# Altium PCB BetaBake_REV_1.0.PcbDoc (part 2 of 8)
Units mil, origin at the board's own origin, x right, y up, seen from the top; angles counter-clockwise.
Board outline 6000 x 4000 mil, 8 copper layers (USB 2.0 (90 Diff) DDR3 Data (50-100), GND (Top Layer high-speed return paths), DDR3 Fly-by Routing (Address, Command, Control), QSPI Flash (Clk, IO), Int4 PWR, Int5 GND (Shielding between L4 and L6), Int6 eMMC High-Speed Data Lines (8-bit bus), SDIO/peripherals, Int7 GND, Escapes, non-critical tracks, decoupling capacitor vias), stack 60.424 mil thick; 426 components, 331 nets, 1941 pads, 428 vias.
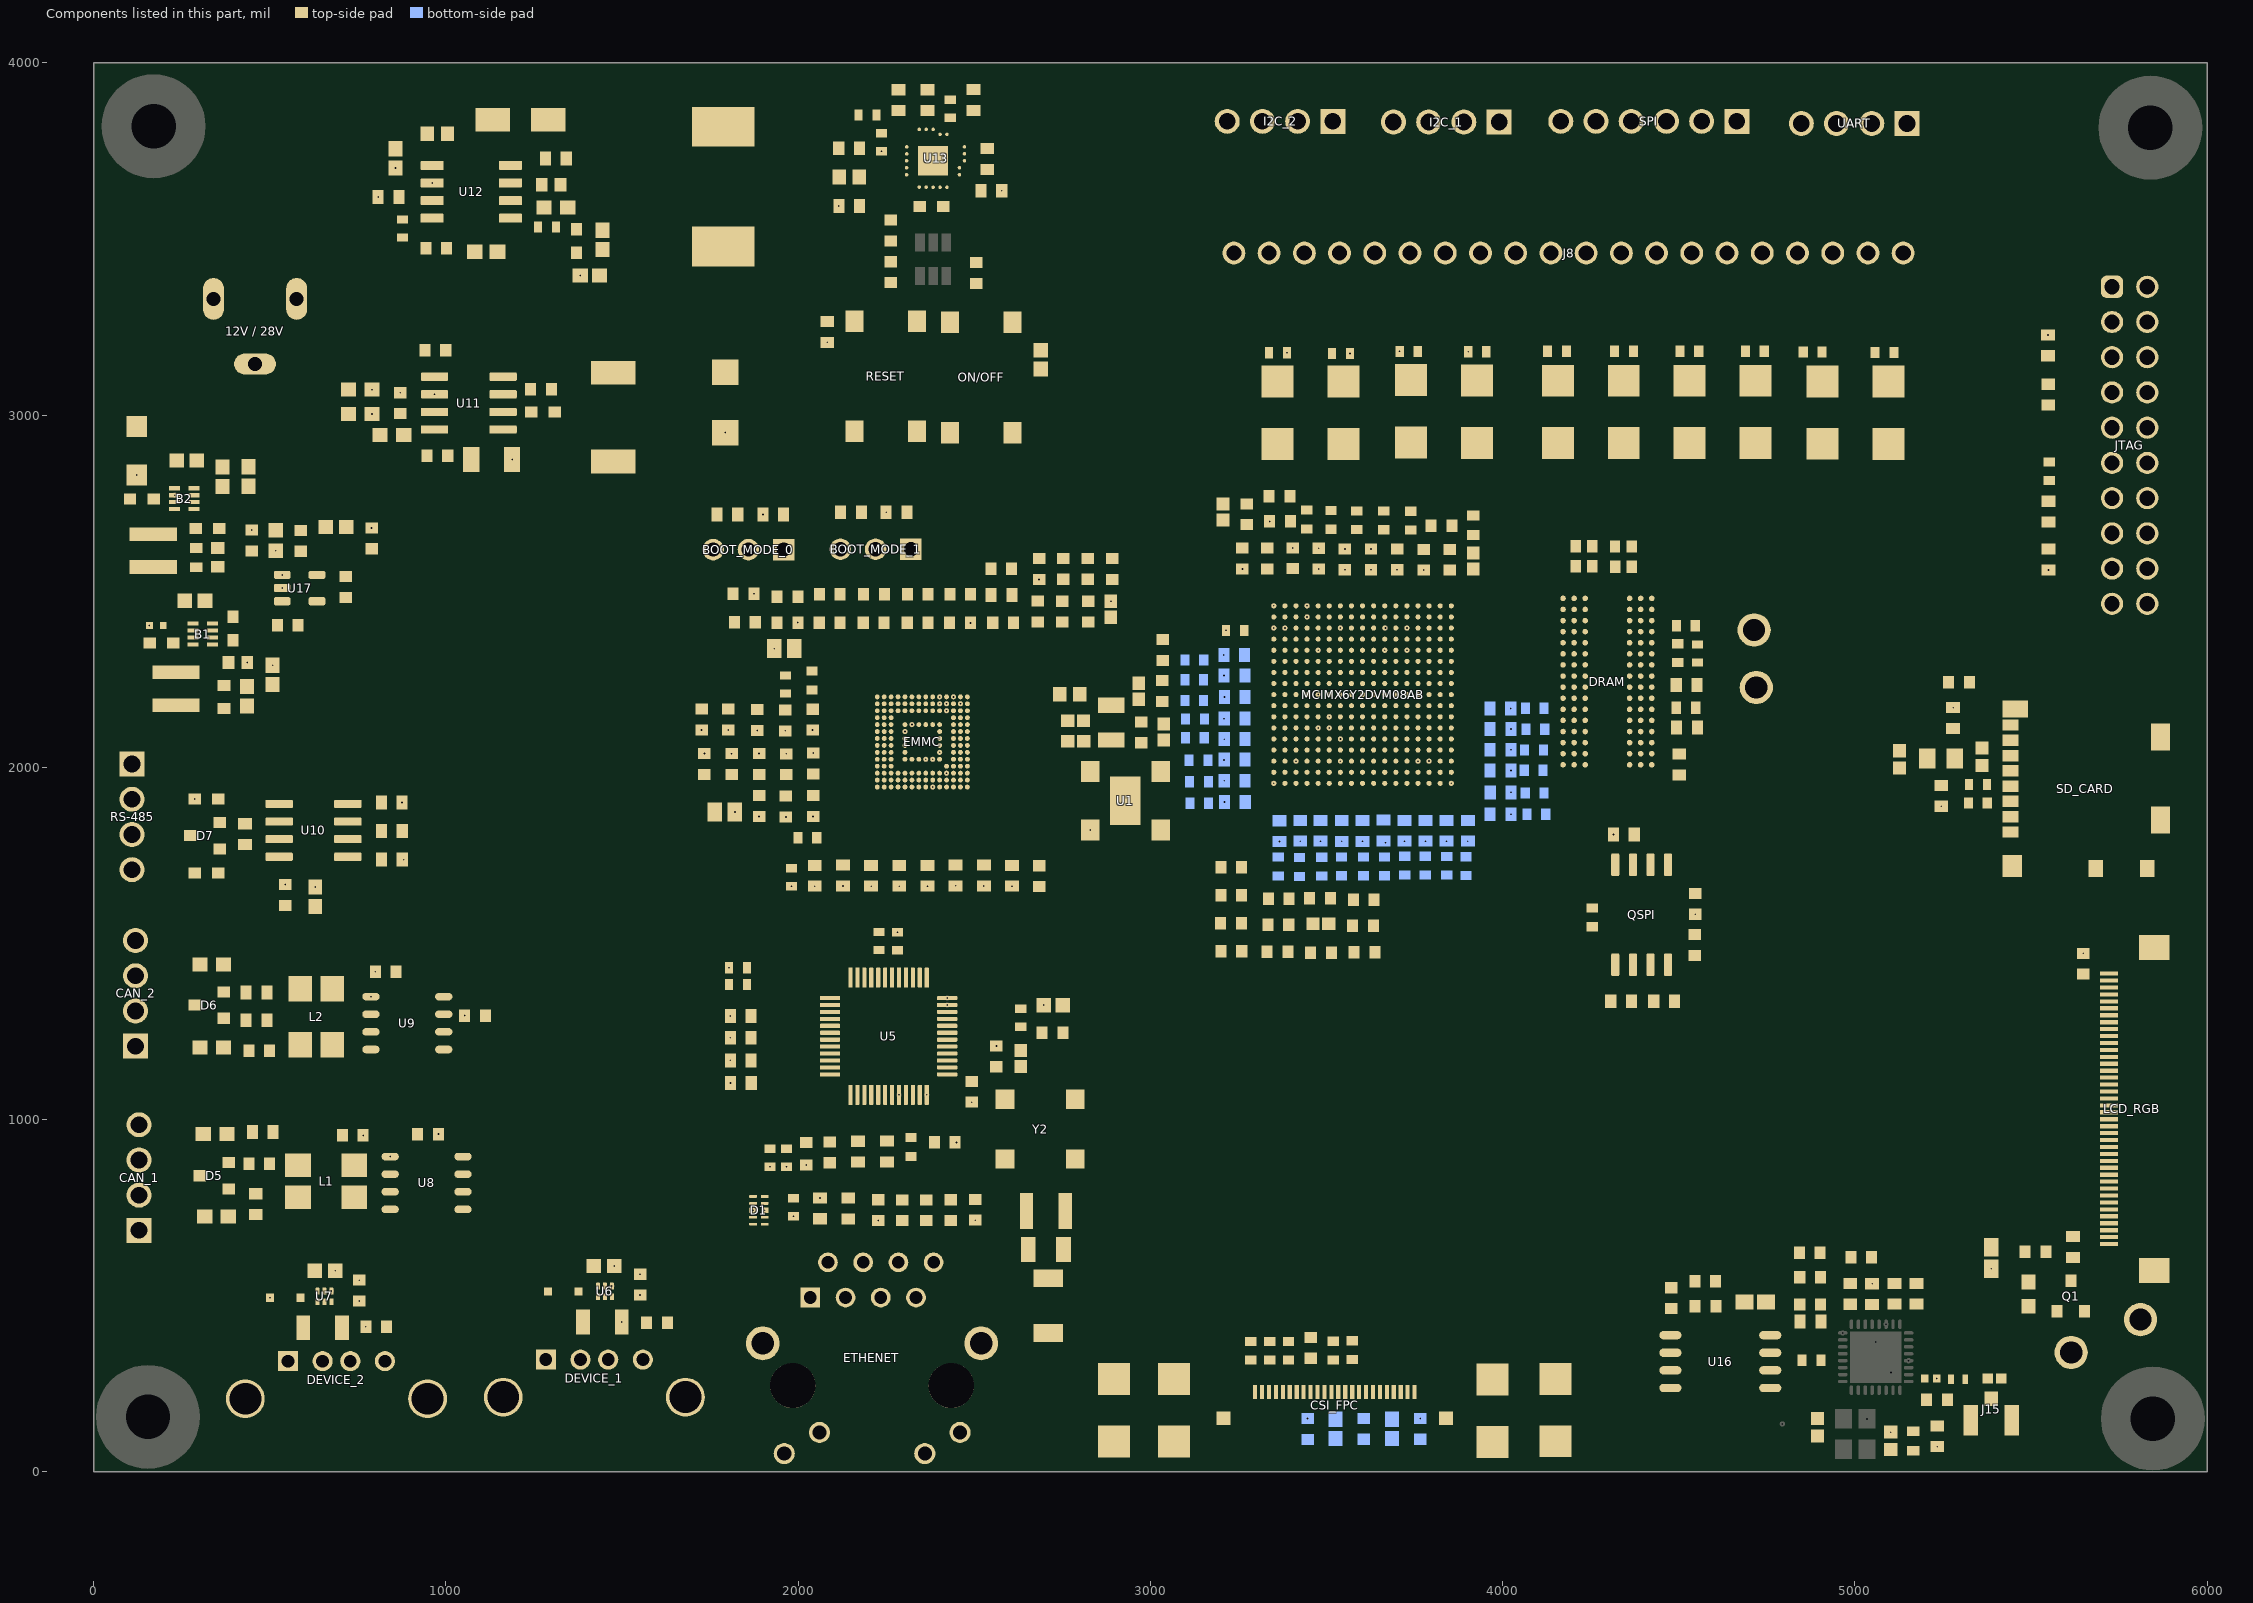
[diagram p8: the components of this part, seen from the top]

## Footprints (in the part's own frame and the unit in brackets; to place one, negate y for a bottom-side part, rotate by r counter-clockwise, add the part's x,y. Pads: shape width x height; smd on the part's side, far side on the other; paste and mask are expansions set on the pad) (continued)
FP-RGP0020A-MFG [mm]
  round 0.252 smd paste-1000 mask+0: 1(-1.9,1) 2(-1.9,0.5) 3(-2.26,0) 4(-2.26,-0.5) 5(-2.26,-1) 6(-1,-1.9) 7(-0.5,-1.9) 8(0,-2.26) 9(0.5,-2.26) 10(1,-2.26) 11(1.9,-1) 12(1.9,-0.5) 13(1.915,0) 14(1.915,0.5) 15(1.915,1) 16(1,1.9) 17(0.5,1.9) 18(0,1.915) 19(-0.5,1.915) 20(-1,1.915)
  rect 2.15x2.15 smd paste-1000 mask+0: 21(0,0)
  USB 2.0 (90 Diff) DDR3 Data (50-100) region: -0.86,2.4 -0.86,1.54 -0.871,1.486 -0.901,1.441 -0.946,1.411 -1,1.4 -1,1.4 -1.054,1.411 -1.099,1.441 -1.129,1.486 -1.14,1.54 -1.14,1.54 -1.14,2.4
  USB 2.0 (90 Diff) DDR3 Data (50-100) region: -0.36,2.4 -0.36,1.54 -0.371,1.486 -0.401,1.441 -0.446,1.411 -0.5,1.4 -0.5,1.4 -0.554,1.411 -0.599,1.441 -0.629,1.486 -0.64,1.54 -0.64,1.54 -0.64,2.4
  USB 2.0 (90 Diff) DDR3 Data (50-100) region: 0.14,2.4 0.14,1.54 0.129,1.486 0.099,1.441 0.054,1.411 0,1.4 0,1.4 -0.054,1.411 -0.099,1.441 -0.129,1.486 -0.14,1.54 -0.14,1.54 -0.14,2.4
  USB 2.0 (90 Diff) DDR3 Data (50-100) region: 0.64,2.4 0.64,1.54 0.629,1.486 0.599,1.441 0.554,1.411 0.5,1.4 0.5,1.4 0.446,1.411 0.401,1.441 0.371,1.486 0.36,1.54 0.36,1.54 0.36,2.4
  USB 2.0 (90 Diff) DDR3 Data (50-100) region: 1.14,2.4 1.14,1.54 1.129,1.486 1.099,1.441 1.054,1.411 1,1.4 1,1.4 0.946,1.411 0.901,1.441 0.871,1.486 0.86,1.54 0.86,1.54 0.86,2.4
  USB 2.0 (90 Diff) DDR3 Data (50-100) region: 0.86,-2.4 0.86,-1.54 0.871,-1.486 0.901,-1.441 0.946,-1.411 1,-1.4 1,-1.4 1.054,-1.411 1.099,-1.441 1.129,-1.486 1.14,-1.54 1.14,-1.54 1.14,-2.4
  USB 2.0 (90 Diff) DDR3 Data (50-100) region: 0.36,-2.4 0.36,-1.54 0.371,-1.486 0.401,-1.441 0.446,-1.411 0.5,-1.4 0.5,-1.4 0.554,-1.411 0.599,-1.441 0.629,-1.486 0.64,-1.54 0.64,-1.54 0.64,-2.4
  USB 2.0 (90 Diff) DDR3 Data (50-100) region: -0.14,-2.4 -0.14,-1.54 -0.129,-1.486 -0.099,-1.441 -0.054,-1.411 0,-1.4 0,-1.4 0.054,-1.411 0.099,-1.441 0.129,-1.486 0.14,-1.54 0.14,-1.54 0.14,-2.4
  USB 2.0 (90 Diff) DDR3 Data (50-100) region: -0.64,-2.4 -0.64,-1.54 -0.629,-1.486 -0.599,-1.441 -0.554,-1.411 -0.5,-1.4 -0.5,-1.4 -0.446,-1.411 -0.401,-1.441 -0.371,-1.486 -0.36,-1.54 -0.36,-1.54 -0.36,-2.4
  USB 2.0 (90 Diff) DDR3 Data (50-100) region: -1.14,-2.4 -1.14,-1.54 -1.129,-1.486 -1.099,-1.441 -1.054,-1.411 -1,-1.4 -1,-1.4 -0.946,-1.411 -0.901,-1.441 -0.871,-1.486 -0.86,-1.54 -0.86,-1.54 -0.86,-2.4
  USB 2.0 (90 Diff) DDR3 Data (50-100) region: 2.4,0.86 1.54,0.86 1.486,0.871 1.441,0.901 1.411,0.946 1.4,1 1.4,1 1.411,1.054 1.441,1.099 1.486,1.129 1.54,1.14 1.54,1.14 2.4,1.14
  USB 2.0 (90 Diff) DDR3 Data (50-100) region: 2.4,0.36 1.54,0.36 1.486,0.371 1.441,0.401 1.411,0.446 1.4,0.5 1.4,0.5 1.411,0.554 1.441,0.599 1.486,0.629 1.54,0.64 1.54,0.64 2.4,0.64
  USB 2.0 (90 Diff) DDR3 Data (50-100) region: 2.4,-0.14 1.54,-0.14 1.486,-0.129 1.441,-0.099 1.411,-0.054 1.4,0 1.4,0 1.411,0.054 1.441,0.099 1.486,0.129 1.54,0.14 1.54,0.14 2.4,0.14
  USB 2.0 (90 Diff) DDR3 Data (50-100) region: 2.4,-0.64 1.54,-0.64 1.486,-0.629 1.441,-0.599 1.411,-0.554 1.4,-0.5 1.4,-0.5 1.411,-0.446 1.441,-0.401 1.486,-0.371 1.54,-0.36 1.54,-0.36 2.4,-0.36
  USB 2.0 (90 Diff) DDR3 Data (50-100) region: 2.4,-1.14 1.54,-1.14 1.486,-1.129 1.441,-1.099 1.411,-1.054 1.4,-1 1.4,-1 1.411,-0.946 1.441,-0.901 1.486,-0.871 1.54,-0.86 1.54,-0.86 2.4,-0.86
  USB 2.0 (90 Diff) DDR3 Data (50-100) region: -2.4,-0.86 -1.54,-0.86 -1.486,-0.871 -1.441,-0.901 -1.411,-0.946 -1.4,-1 -1.4,-1 -1.411,-1.054 -1.441,-1.099 -1.486,-1.129 -1.54,-1.14 -1.54,-1.14 -2.4,-1.14
  USB 2.0 (90 Diff) DDR3 Data (50-100) region: -2.4,-0.36 -1.54,-0.36 -1.486,-0.371 -1.441,-0.401 -1.411,-0.446 -1.4,-0.5 -1.4,-0.5 -1.411,-0.554 -1.441,-0.599 -1.486,-0.629 -1.54,-0.64 -1.54,-0.64 -2.4,-0.64
  USB 2.0 (90 Diff) DDR3 Data (50-100) region: -2.4,0.14 -1.54,0.14 -1.486,0.129 -1.441,0.099 -1.411,0.054 -1.4,0 -1.4,0 -1.411,-0.054 -1.441,-0.099 -1.486,-0.129 -1.54,-0.14 -1.54,-0.14 -2.4,-0.14
  USB 2.0 (90 Diff) DDR3 Data (50-100) region: -2.4,0.64 -1.54,0.64 -1.486,0.629 -1.441,0.599 -1.411,0.554 -1.4,0.5 -1.4,0.5 -1.411,0.446 -1.441,0.401 -1.486,0.371 -1.54,0.36 -1.54,0.36 -2.4,0.36
  USB 2.0 (90 Diff) DDR3 Data (50-100) region: -2.4,1.14 -1.54,1.14 -1.486,1.129 -1.441,1.099 -1.411,1.054 -1.4,1 -1.4,1 -1.411,0.946 -1.441,0.901 -1.486,0.871 -1.54,0.86 -1.54,0.86 -2.4,0.86
  silkscreen extent -3.1,-2.07 2.07,2.07, body extent -2.5,-2.5 2.5,2.5, height 0.25
FP-RT0603-MFG [mm]
  rect 0.9x0.8 smd paste+0 mask+0: 1(-0.85,0) 2(0.85,0)
  silkscreen extent -0.85,-0.81 0.86,0.8, body extent -1.4,-0.55 1.4,0.55, height 0.25
FP-SMA-MFG [mm]
  rect 2.5x1.7 smd paste+0 mask+0: 1(-2,0) 2(2,0)
  silkscreen extent -3.92,-1.46 2.3,1.46, body extent -3.35,-1.56 3.35,1.56, height 0.25
FP-SMBJ-CA-MFG [mm]
  rect 1.27x2.1 smd paste+0 mask+0: 1(-1.98,0) 2(1.98,0)
  silkscreen extent -2.28,-1.97 2.28,1.97, body extent -2.72,-2.07 2.72,2.07, height 0.25
FP-SMC-MFG [mm]
  rect 1.72x3.2 smd paste+0 mask+0: 1(-3.205,0) 2(3.205,0)
  silkscreen extent -4.75,-3.11 3.55,3.11, body extent -4.17,-3.21 4.17,3.21, height 0.25
FP-SOD323-CA-MFG [mm]
  rect 0.6x0.6 smd paste-1000 mask+0: 1(-1.1,0) 2(1.1,0)
  silkscreen extent -0.43,-0.67 0.43,0.67, body extent -1.53,-0.82 1.53,0.82, height 0.25
FP-TW-IPC_C [mm]
  round 0.399 smd paste+0 mask+0: A1(-3.2,6) A2(-2.4,6) A3(-1.6,6) A7(1.6,6) A8(2.4,6) A9(3.2,6) B1(-3.2,5.2) B2(-2.4,5.2) B3(-1.6,5.2) B7(1.6,5.2) B8(2.4,5.2) B9(3.2,5.2) C1(-3.2,4.4) C2(-2.4,4.4) C3(-1.6,4.4) C7(1.6,4.4) C8(2.4,4.4) C9(3.2,4.4) D1(-3.2,3.6) D2(-2.4,3.6) D3(-1.6,3.6) D7(1.6,3.6) D8(2.4,3.6) D9(3.2,3.6) E1(-3.2,2.8) E2(-2.4,2.8) E3(-1.6,2.8) E7(1.6,2.8) E8(2.4,2.8) E9(3.2,2.8) F1(-3.2,2) F2(-2.4,2) F3(-1.6,2) F7(1.6,2) F8(2.4,2) F9(3.2,2) G1(-3.2,1.2) G2(-2.4,1.2) G3(-1.6,1.2) G7(1.6,1.2) G8(2.4,1.2) G9(3.2,1.2) H1(-3.2,0.4) H2(-2.4,0.4) H3(-1.6,0.4) H7(1.6,0.4) H8(2.4,0.4) H9(3.2,0.4) J1(-3.2,-0.4) J2(-2.4,-0.4) J3(-1.6,-0.4) J7(1.6,-0.4) J8(2.4,-0.4) J9(3.2,-0.4) K1(-3.2,-1.2) K2(-2.4,-1.2) K3(-1.6,-1.2) K7(1.6,-1.2) K8(2.4,-1.2) K9(3.2,-1.2) L1(-3.2,-2) L2(-2.4,-2) L3(-1.6,-2) L7(1.6,-2) L8(2.4,-2) L9(3.2,-2) M1(-3.2,-2.8) M2(-2.4,-2.8) M3(-1.6,-2.8) M7(1.6,-2.8) M8(2.4,-2.8) M9(3.2,-2.8) N1(-3.2,-3.6) N2(-2.4,-3.6) N3(-1.6,-3.6) N7(1.6,-3.6) N8(2.4,-3.6) N9(3.2,-3.6) P1(-3.2,-4.4) P2(-2.4,-4.4) P3(-1.6,-4.4) P7(1.6,-4.4) P8(2.4,-4.4) P9(3.2,-4.4) R1(-3.2,-5.2) R2(-2.4,-5.2) R3(-1.6,-5.2) R7(1.6,-5.2) R8(2.4,-5.2) R9(3.2,-5.2) T1(-3.2,-6) T2(-2.4,-6) T3(-1.6,-6) T7(1.6,-6) T8(2.4,-6) T9(3.2,-6)
  silkscreen extent -4.55,-7 4,7, body extent -4.1,-7.1 4.1,7.1, height 0.25
FP-XFL4015-MFG [mm]
  rect 0.98x3.4 smd paste+0 mask+0: 1(-1.185,0) 2(1.185,0)
  silkscreen extent -2.67,-2.15 2.15,2.15, body extent -2.25,-2.25 2.25,2.25, height 0.25
IND_SPM10054T_TDK [mil]
  rect 113x177 smd paste+0 mask+0: 1(-170,0) 2(170,0)
  silkscreen extent -226,-210 226,210, body extent -221,-204 221,204, height 213
J00-00XXNL [mil]
  rect 56x56 hole 36: 1(175,-250)
  round 56 hole 36: 2(125,-350) 3(75,-250) 4(25,-350) 5(-25,-250) 6(-75,-350) 7(-125,-250) 8(-175,-350)
  round 60 hole 40: 9(249,193) 10(149,133) 11(-150,193) 12(-250,133)
  round 96 hole 64: S1(-310,-120) S2(310,-120)
  round 128 hole 128 unplated: ""(-225,0) ""(225,0)
  silkscreen extent -375,-425 375,425, body extent -395,-415 392,425, height 601
KEYSTONE_5277 [mm]
  round 2.4 hole 1.6: 1(0,0)
  silkscreen extent -1.59,-1.59 1.59,1.59, body extent -1.07,-1.85 2.09,1.33, height 3.17
LFBGA289_SOT1534-2_NXP [mm]
  round 0.366 smd paste+0 mask+0: A1(-6.4,6.4) A2(-5.6,6.4) A3(-4.8,6.4) A4(-4,6.4) A5(-3.2,6.4) A6(-2.4,6.4) A7(-1.6,6.4) A8(-0.8,6.4) A9(0,6.4) A10(0.8,6.4) A11(1.6,6.4) A12(2.4,6.4) A13(3.2,6.4) A14(4,6.4) A15(4.8,6.4) A16(5.6,6.4) A17(6.4,6.4) B1(-6.4,5.6) B2(-5.6,5.6) B3(-4.8,5.6) B4(-4,5.6) B5(-3.2,5.6) B6(-2.4,5.6) B7(-1.6,5.6) B8(-0.8,5.6) B9(0,5.6) B10(0.8,5.6) B11(1.6,5.6) B12(2.4,5.6) B13(3.2,5.6) B14(4,5.6) B15(4.8,5.6) B16(5.6,5.6) B17(6.4,5.6) C1(-6.4,4.8) C2(-5.6,4.8) C3(-4.8,4.8) C4(-4,4.8) C5(-3.2,4.8) C6(-2.4,4.8) C7(-1.6,4.8) C8(-0.8,4.8) C9(0,4.8) C10(0.8,4.8) C11(1.6,4.8) C12(2.4,4.8) C13(3.2,4.8) C14(4,4.8) C15(4.8,4.8) C16(5.6,4.8) C17(6.4,4.8) D1(-6.4,4) D2(-5.6,4) D3(-4.8,4) D4(-4,4) D5(-3.2,4) D6(-2.4,4) D7(-1.6,4) D8(-0.8,4) D9(0,4) D10(0.8,4) D11(1.6,4) D12(2.4,4) D13(3.2,4) D14(4,4) D15(4.8,4) D16(5.6,4) D17(6.4,4) E1(-6.4,3.2) E2(-5.6,3.2) E3(-4.8,3.2) E4(-4,3.2) E5(-3.2,3.2) E6(-2.4,3.2) E7(-1.6,3.2) E8(-0.8,3.2) E9(0,3.2) E10(0.8,3.2) E11(1.6,3.2) E12(2.4,3.2) E13(3.2,3.2) E14(4,3.2) E15(4.8,3.2) E16(5.6,3.2) E17(6.4,3.2) F1(-6.4,2.4) F2(-5.6,2.4) F3(-4.8,2.4) F4(-4,2.4) F5(-3.2,2.4) F6(-2.4,2.4) F7(-1.6,2.4) F8(-0.8,2.4) F9(0,2.4) F10(0.8,2.4) F11(1.6,2.4) F12(2.4,2.4) F13(3.2,2.4) F14(4,2.4) F15(4.8,2.4) F16(5.6,2.4) F17(6.4,2.4) G1(-6.4,1.6) G2(-5.6,1.6) G3(-4.8,1.6) G4(-4,1.6) G5(-3.2,1.6) G6(-2.4,1.6) G7(-1.6,1.6) G8(-0.8,1.6) G9(0,1.6) G10(0.8,1.6) G11(1.6,1.6) G12(2.4,1.6) G13(3.2,1.6) G14(4,1.6) G15(4.8,1.6) G16(5.6,1.6) G17(6.4,1.6) H1(-6.4,0.8) H2(-5.6,0.8) H3(-4.8,0.8) H4(-4,0.8) H5(-3.2,0.8) H6(-2.4,0.8) H7(-1.6,0.8) H8(-0.8,0.8) H9(0,0.8) H10(0.8,0.8) H11(1.6,0.8) H12(2.4,0.8) H13(3.2,0.8) H14(4,0.8) H15(4.8,0.8) H16(5.6,0.8) H17(6.4,0.8) J1(-6.4,0) J2(-5.6,0) J3(-4.8,0) J4(-4,0) J5(-3.2,0) J6(-2.4,0) J7(-1.6,0) J8(-0.8,0) J9(0,0) J10(0.8,0) J11(1.6,0) J12(2.4,0) J13(3.2,0) J14(4,0) J15(4.8,0) J16(5.6,0) J17(6.4,0) K1(-6.4,-0.8) K2(-5.6,-0.8) K3(-4.8,-0.8) K4(-4,-0.8) K5(-3.2,-0.8) K6(-2.4,-0.8) K7(-1.6,-0.8) K8(-0.8,-0.8) K9(0,-0.8) K10(0.8,-0.8) K11(1.6,-0.8) K12(2.4,-0.8) K13(3.2,-0.8) K14(4,-0.8) K15(4.8,-0.8) K16(5.6,-0.8) K17(6.4,-0.8) L1(-6.4,-1.6) L2(-5.6,-1.6) L3(-4.8,-1.6) L4(-4,-1.6) L5(-3.2,-1.6) L6(-2.4,-1.6) L7(-1.6,-1.6) L8(-0.8,-1.6) L9(0,-1.6) L10(0.8,-1.6) L11(1.6,-1.6) L12(2.4,-1.6) L13(3.2,-1.6) L14(4,-1.6) L15(4.8,-1.6) L16(5.6,-1.6) L17(6.4,-1.6) M1(-6.4,-2.4) M2(-5.6,-2.4) M3(-4.8,-2.4) M4(-4,-2.4) M5(-3.2,-2.4) M6(-2.4,-2.4) M7(-1.6,-2.4) M8(-0.8,-2.4) M9(0,-2.4) M10(0.8,-2.4) M11(1.6,-2.4) M12(2.4,-2.4) M13(3.2,-2.4) M14(4,-2.4) M15(4.8,-2.4) M16(5.6,-2.4) M17(6.4,-2.4) N1(-6.4,-3.2) N2(-5.6,-3.2) N3(-4.8,-3.2) N4(-4,-3.2) N5(-3.2,-3.2) N6(-2.4,-3.2) N7(-1.6,-3.2) N8(-0.8,-3.2) N9(0,-3.2) N10(0.8,-3.2) N11(1.6,-3.2) N12(2.4,-3.2) N13(3.2,-3.2) N14(4,-3.2) N15(4.8,-3.2) N16(5.6,-3.2) N17(6.4,-3.2) P1(-6.4,-4) P2(-5.6,-4) P3(-4.8,-4) P4(-4,-4) P5(-3.2,-4) P6(-2.4,-4) P7(-1.6,-4) P8(-0.8,-4) P9(0,-4) P10(0.8,-4) P11(1.6,-4) P12(2.4,-4) P13(3.2,-4) P14(4,-4) P15(4.8,-4) P16(5.6,-4) P17(6.4,-4) R1(-6.4,-4.8) R2(-5.6,-4.8) R3(-4.8,-4.8) R4(-4,-4.8) R5(-3.2,-4.8) R6(-2.4,-4.8) R7(-1.6,-4.8) R8(-0.8,-4.8) R9(0,-4.8) R10(0.8,-4.8) R11(1.6,-4.8) R12(2.4,-4.8) R13(3.2,-4.8) R14(4,-4.8) R15(4.8,-4.8) R16(5.6,-4.8) R17(6.4,-4.8) T1(-6.4,-5.6) T2(-5.6,-5.6) T3(-4.8,-5.6) T4(-4,-5.6) T5(-3.2,-5.6) T6(-2.4,-5.6) T7(-1.6,-5.6) T8(-0.8,-5.6) T9(0,-5.6) T10(0.8,-5.6) T11(1.6,-5.6) T12(2.4,-5.6) T13(3.2,-5.6) T14(4,-5.6) T15(4.8,-5.6) T16(5.6,-5.6) T17(6.4,-5.6) U1(-6.4,-6.4) U2(-5.6,-6.4) U3(-4.8,-6.4) U4(-4,-6.4) U5(-3.2,-6.4) U6(-2.4,-6.4) U7(-1.6,-6.4) U8(-0.8,-6.4) U9(0,-6.4) U10(0.8,-6.4) U11(1.6,-6.4) U12(2.4,-6.4) U13(3.2,-6.4) U14(4,-6.4) U15(4.8,-6.4) U16(5.6,-6.4) U17(6.4,-6.4)
  silkscreen extent -7.25,-7.25 7.25,7.25, body extent -7,-7 7,7, height 1.32
MOLX-54548-2471 [mm] "FPC Connector, 24-Leads, Right Angle, Pitch 0.5 mm, Mated Height 1.2 mm, SMT"
  rect 0.3x1 smd: 1(-5.75,0.95) 2(-5.25,0.95) 3(-4.75,0.95) 4(-4.25,0.95) 5(-3.75,0.95) 6(-3.25,0.95) 7(-2.75,0.95) 8(-2.25,0.95) 9(-1.75,0.95) 10(-1.25,0.95) 11(-0.75,0.95) 12(-0.25,0.95) 13(0.25,0.95) 14(0.75,0.95) 15(1.25,0.95) 16(1.75,0.95) 17(2.25,0.95) 18(2.75,0.95) 19(3.25,0.95) 20(3.75,0.95) 21(4.25,0.95) 22(4.75,0.95) 23(5.25,0.95) 24(5.75,0.95)
  rect 1x1 smd: MP1(-8.025,-0.95) MP2(8.025,-0.95)
  USB 2.0 (90 Diff) DDR3 Data (50-100) region: 8.85,-0.3 7.2,-0.3 7.2,-1.6 8.85,-1.6
  USB 2.0 (90 Diff) DDR3 Data (50-100) region: -8.85,-0.3 -7.2,-0.3 -7.2,-1.6 -8.85,-1.6
  silkscreen extent -8.6,-3.85 8.6,2.13, body extent -8.6,-3.85 8.6,1.15, height 1.21
NXP-SOIC-8_L [mm] "SOIC, 8-Leads, Body 5x4mm, Pitch 1.27mm, IPC High Density"
  oval 1.25x0.55 smd: 1(-2.625,1.905) 2(-2.625,0.635) 3(-2.625,-0.635) 4(-2.625,-1.905) 5(2.625,-1.905) 6(2.625,-0.635) 7(2.625,0.635) 8(2.625,1.905)
  silkscreen extent -2.75,-2.5 1.6,2.85, body extent -3,-2.5 3,2.5, height 1.75
PT0048A_N [mm] "QFP, 48-Leads, Body 7x7mm, Pitch 0.5mm, IPC Medium Density"
  rrect33% 1.45x0.3 smd: 1(-4.225,2.75) 2(-4.225,2.25) 3(-4.225,1.75) 4(-4.225,1.25) 5(-4.225,0.75) 6(-4.225,0.25) 7(-4.225,-0.25) 8(-4.225,-0.75) 9(-4.225,-1.25) 10(-4.225,-1.75) 11(-4.225,-2.25) 12(-4.225,-2.75) 25(4.225,-2.75) 26(4.225,-2.25) 27(4.225,-1.75) 28(4.225,-1.25) 29(4.225,-0.75) 30(4.225,-0.25) 31(4.225,0.25) 32(4.225,0.75) 33(4.225,1.25) 34(4.225,1.75) 35(4.225,2.25) 36(4.225,2.75)
  rrect33% 0.3x1.45 smd: 13(-2.75,-4.225) 14(-2.25,-4.225) 15(-1.75,-4.225) 16(-1.25,-4.225) 17(-0.75,-4.225) 18(-0.25,-4.225) 19(0.25,-4.225) 20(0.75,-4.225) 21(1.25,-4.225) 22(1.75,-4.225) 23(2.25,-4.225) 24(2.75,-4.225) 37(2.75,4.225) 38(2.25,4.225) 39(1.75,4.225) 40(1.25,4.225) 41(0.75,4.225) 42(0.25,4.225) 43(-0.25,4.225) 44(-0.75,4.225) 45(-1.25,4.225) 46(-1.75,4.225) 47(-2.25,4.225) 48(-2.75,4.225)
  silkscreen extent -4.35,-3.1 3.1,3.58, body extent -4.51,-4.51 4.51,4.51, height 1.5
PTS645SM43SMTR92LFS_MFG [mm] "Recommended Land Pattern"
  rect 1.55x1.3 smd paste+0 mask+0: 1(-3.975,2.25) 2(3.975,2.25) 3(-3.975,-2.25) 4(3.975,-2.25)
  silkscreen extent -5.52,-3 3,3, body extent -4.5,-3 4.5,3, height 5.3
RESC0603(1608)_L [mm] "Chip Resistor, Body 1.6x0.8mm, IPC High Density"
  rect 0.7x0.9 smd: 1(-0.7,0) 2(0.7,0)
  silkscreen extent -0.05,-0.35 0.05,0.35, body extent -0.85,-0.47 0.85,0.47, height 0.6
RESC1607X60N [mm]
  rect 1.04x1.02 smd: 1(-0.735,0) 2(0.735,0)
  body extent -0.8,-0.4 0.8,0.4, height 0.55
RESC1608X55N#1 [mm]
  rect 0.79x0.93 smd paste+0 mask+0.102: 1(-0.82,0) 2(0.82,0)
  silkscreen extent -0.11,-0.45 0.11,0.45, body extent -0.8,-0.4 0.8,0.4, height 0.55
RESC1608X55N#2 [mm]
  rect 0.79x0.93 smd: 1(-0.82,0) 2(0.82,0)
  silkscreen extent -0.11,-0.45 0.11,0.45, body extent -0.8,-0.4 0.8,0.4, height 0.55
RESC1608X55X25LL10T15 [mm] "Chip Resistor, 2-Leads, Body 1.60x0.80mm, IPC High Density"
  rect 0.6x0.8 smd: 1(-0.65,0) 2(0.65,0)
  body extent -0.85,-0.45 0.85,0.45, height 0.55
RESC1608X55X25ML10T15 [mm] "Chip Resistor, 2-Leads, Body 1.60x0.80mm, IPC Low Density"
  rect 0.8x1 smd: 1(-0.75,0) 2(0.75,0)
  body extent -0.85,-0.45 0.85,0.45, height 0.55
RESC1608X55X25NL10T15 [mm] "Chip Resistor, 2-Leads, Body 1.60x0.80mm, IPC Medium Density"
  rect 0.7x0.9 smd: 1(-0.7,0) 2(0.7,0)
  body extent -0.85,-0.45 0.85,0.45, height 0.55
RESC2013X60X35ML10T20 [mm] "Chip Resistor, 2-Leads, Body 2.1x1.35mm, IPC Low Density"
  rect 1.2x1.45 smd: 1(-1,0) 2(1,0)
  silkscreen extent -0.1,-0.63 0.1,0.63, body extent -1.05,-0.68 1.05,0.67, height 0.6
SMTC-TSW-103-07-X-S [mm] ".025 SQ Post Terminal Strip Assembly, 1x3 Pins, Vertical, 2.54mm Pitch, Male"
  rect 1.55x1.55 hole 1.02: 1(0,0)
  round 1.55 hole 1.02: 2(2.54,0) 3(5.08,0)
  silkscreen extent -1.46,-1.27 6.54,1.27, body extent -1.27,-1.27 6.35,1.27, height 8.38
SOIC127P599X175-8N [mm]
  rrect25% 1.97x0.6 smd paste+0 mask+0.102: 1(-2.47,1.905) 2(-2.47,0.635) 3(-2.47,-0.635) 4(-2.47,-1.905) 5(2.47,-1.905) 6(2.47,-0.635) 7(2.47,0.635) 8(2.47,1.905)
  silkscreen extent -4.14,-2.52 1.95,2.52, body extent -3,-2.45 3,2.45, height 1.75
SOIC127P600X175-8N [mm]
  rrect25% 1.97x0.59 smd paste+0 mask+0.102: 1(-2.475,1.905) 2(-2.475,0.635) 3(-2.475,-0.635) 4(-2.475,-1.905) 5(2.475,-1.905) 6(2.475,-0.635) 7(2.475,0.635) 8(2.475,1.905)
  silkscreen extent -4.54,-2.52 2,2.59, body extent -3,-2.49 3,2.49, height 1.68
SOIC127P790X216-8N#1 [mm]
  rrect25% 1.61x0.58 smd: 1(-3.605,1.905) 2(-3.605,0.635) 3(-3.605,-0.635) 4(-3.605,-1.905) 5(3.605,-1.905) 6(3.605,-0.635) 7(3.605,0.635) 8(3.605,1.905)
  silkscreen extent -5.31,-2.64 2.64,2.64, body extent -3.95,-2.64 3.95,2.64, height 2.16
SOIC127P790X216-8N#2 [mm]
  oval 1.6x0.6 smd: 1(-3.6,1.905) 2(-3.6,0.635) 3(-3.6,-0.635) 4(-3.6,-1.905) 5(3.6,-1.905) 6(3.6,-0.635) 7(3.6,0.635) 8(3.6,1.905)
  silkscreen extent -3.82,-2.65 2.47,2.82, body extent -3.95,-2.64 3.95,2.64, height 2.16
SON50P150X200X100-8N [mm]
  rect 0.8x0.3 smd: 1(-0.7,0.75) 2(-0.7,0.25) 3(-0.7,-0.25) 4(-0.7,-0.75) 5(0.7,-0.75) 6(0.7,-0.25) 7(0.7,0.25) 8(0.7,0.75)
  silkscreen extent -1.22,1.28 -0.97,1.52
SOT23-3 [mm]
  rect 0.8x0.9 smd: 1(-0.95,-1) 2(0.95,-1) 3(0,1.1)
  silkscreen extent -1.4,-0.1 1.4,0.7, body extent -1.15,-1.45 1.15,1.45, height 1.1
SOT95P280X145-5N [mm]
  rrect50% 1.21x0.59 smd paste+0 mask+0.102: 1(-1.255,0.95) 2(-1.255,0) 3(-1.255,-0.95) 4(1.255,-0.95) 5(1.255,0.95)
  silkscreen extent -2.51,-1.45 0.8,1.45, body extent -1.4,-1.45 1.4,1.45, height 1.45
TE-292303-1_V [mm] "THD, 4-Leads, Body 13.13x14mm, Pitch 2.5mm"
  rect 1.45x1.45 hole 0.92: 1(-3.5,1.144)
  round 1.45 hole 0.92: 2(-1,1.144) 3(1,1.144) 4(3.5,1.144)
  round 2.8 hole 2.3: 5(-6.57,-1.566) 6(6.57,-1.566)
  silkscreen extent -6.57,-11.85 6.57,3.25, body extent -8.12,-11.85 8.12,2.15, height 7.72
TE_282834-4 [mm]
  rect 1.8x1.8 / inner round 1.8 / far side rect 1.8x1.8 hole 1.2: 1(-3.81,0)
  round 1.8 hole 1.2: 2(-1.27,0) 3(1.27,0) 4(3.81,0)
  silkscreen extent -6.16,-3.25 5.31,3.25, body extent -5.31,-3.25 5.31,3.25, height 10
TE_282834-6 [mm]
  rect 1.8x1.8 / inner round 1.8 / far side rect 1.8x1.8 hole 1.2: 1(-6.35,0)
  round 1.8 hole 1.2: 2(-3.81,0) 3(-1.27,0) 4(1.27,0) 5(3.81,0) 6(6.35,0)
  silkscreen extent -8.7,-3.25 7.85,3.25, body extent -7.85,-3.25 7.85,3.25, height 10
TE_1909763-1 [mm]
  rect 1x1.05 smd: 1(0,-1.525)
  rect 1.05x2.2 smd: G1(-1.475,0) G2(1.475,0)
  silkscreen extent -0.6,1.3 0.6,1.3, body extent -1.5,0 1.5,1.23, height 1.55
WE-PD_6033R [mm] "SMT Shielded Power Inductor, 2-leads, body 5.9x6.2mm"
  rect 1.85x1.9 smd: 1(-2.175,0) 2(2.175,0)
  USB 2.0 (90 Diff) DDR3 Data (50-100) keep-out region: -2.95,-3.1 -2.95,-1.15 -1.05,-1.15 -1.05,1.15 -2.95,1.15 -2.95,3.1 2.95,3.1 2.95,1.15 1.05,1.15 1.05,-1.15 2.95,-1.15 2.95,-3.1
  silkscreen extent -3.72,-3.25 3.1,3.25, body extent -2.95,-3.1 2.95,3.1, height 2.9
WE-TVSP_DO-214AA_Bidirectional [mm] "Power TVS Diode, 2-Leads. body 4.32x3.62mm"
  rect 2.3x2.3 smd: 1(-1272.25,-1270) 2(-1267.75,-1270)
  silkscreen extent -1272.28,-1271.97 -1267.72,-1268.03, body extent -1272.7,-1271.81 -1267.3,-1268.19, height 2.38
XTAL_ECS-.327-6-34RR-TR [mm]
  rect 1.1x1.9 smd: 1(-1.25,0) 2(1.25,0)
  silkscreen extent -2.84,-0.75 0.44,0.75, body extent -1.6,-0.75 1.6,0.75, height 0.9

## Part data
1V4: library part CMP-18399-000022-1, "LED RED DIFFUSED 0402 SMD", Case Code (Imperial)=0402, Case Code (Metric)=1005, Color=Red, Forward Current=20mA, Forward Voltage=1.9V, Lens Color=White, Max Operating Temperature=85°C, Max Power Dissipation=60mW, Min Operating Temperature=-40°C, Package Quantity=4000, Reverse Voltage=5V, Case/Package=0402, Contact Plating=Gold, Depth=0.5mm, Dominant Wavelength=626nm, Height=0.4mm, Illumination Color=Red, Lead Free="Lead Free", Length=1mm, Lens Style=Diffused, Lens Transparency=Diffused, Luminous Flux=155lm, Luminous Intensity=90mcd, Mount="Surface Mount", Number of Elements=1, Number of LEDs=1, Number of Pins=2, Packaging="Tape and Reel", Power Dissipation=60mW, Power Rating=60mW, Radiation Hardening=No, REACH SVHC="No SVHC", Test Current=20mA, Viewing Angle=130°, Wavelength=626nm, Width=0.5mm
1V35: library part CMP-2000-05061-2, "LED GREEN DIFFUSED 1206 SMD", Colour=Green, Forward Current=20mA, Forward Voltage=2.2V, Manufacturer=Broadcom, Manufacturer Part Number=HSMG-C150, Max Junction Temp=+95°C, Power Dissipation=65mW, Reverse Voltage=5V, Temperature="-40°C to +85°C", Temperature Range High=+85°C, Temperature Range Low=-40°C, Automotive=No, Category=Diode, ComponentLink2Description=Datasheet, ComponentLink2URL=https://docs.broadcom.com/docs/AV02-0551EN, Device Class L1=Optoelectronics, Device Class L2=LEDs, Device Class L3=unset, Digikey Description="LED GREEN DIFFUSED 1206 SMD", Height=1.2mm, Ipc Land Pattern Name=DIOCP320160X55, Lead Free=Yes, Led Orientation="Top View", Luminous Intensity=15mcd, Mouser Description="LED Uni-Color Green 570nm 2-Pin Chip LED T/R", Octopart=https://octopart.com/hsmg-c150-broadcom-71131304, Package=HSMG-C150, Peak Emmision Wavelength=570nm, RoHS=TRUE, Viewing Angle=170°, Wavelength=572nm
"12V / 28V": "2.0 x 6.5 mm, 5.0 A, Horizontal, Through Hole, Tapered Pins, Dc Power Jack Connector", Package=None, Check_prices=https://www.snapeda.com/parts/PJ-102AH/Same+Sky/view-part/?ref=eda, MF="Same Sky", MP=PJ-102AH, SnapEDA_Link=https://www.snapeda.com/parts/PJ-102AH/Same+Sky/view-part/?ref=snap
B1 B2: "2.4V-5.5V input, 2A step-down converter With 1% Accuracy in 1.5x2mm QFN", Manufacturer_Name="Texas Instruments", Mouser Part Number=595-TPS62822DLCR, Datasheet Link=http://www.ti.com/lit/gpn/tps62822, Geometry.Height=1mm, Manufacturer_Part_Number=TPS62822DLCR, Mouser Price/Stock=https://www.mouser.co.uk/ProductDetail/Texas-Instruments/TPS62822DLCR?qs=55YtniHzbhCS2IKlL8URbA%3D%3D
BOOT_MODE_0 BOOT_MODE_1: library part CMP-1024-00333-1, "0.025\" SQ Post Header, Through-hole, Vertical, -55 to 125 degC, 2.54 mm Pitch, 3-Pin, Male, RoHS", Manufacturer=Samtec, Temperature Range="-55 to 125 degC", ComponentLink1Description="Manufacturer URL", ComponentLink1URL=http://www.samtec.com, ComponentLink2Description=Datasheet, ComponentLink2URL=http://www.samtec.com/documents/webfiles/pdf/TSW_TH.PDF, ComponentLink3Description="Package Specification", ComponentLink3URL=http://www.samtec.com/documents/webfiles/cpdf/TSW-XXX-XX-XXX-X-XX-XXX-MKT.pdf, DatasheetVersion=F-214, Mounting Technology=Through-hole, Orientation=Vertical, PackageDescription=".025[0.64] SQ. Post Terminal Strip Assembly", PackageReference=TSW-103-07-X-S, PackageVersion="DM, 8/1988", PartNumber=TSW-103-07-G-S, Pitch="2.54 mm", RoHS=True
C1 C5 C6 C7 C28 C29 C41 C42 C96: library part CMP-03422-001507-1, "CAP CER 10UF 10V X5R 0603", Case Code (Imperial)=0603, Case Code (Metric)=1608, Dielectric=X5R, Max Operating Temperature=85°C, Min Operating Temperature=-55°C, Package Quantity=4000, Resistor Type=Ceramic, Tolerance=10%, Voltage Rating=10V, Capacitance=10uF, Case/Package=0603, Depth=0.8mm, Halogen Free="Halogen Free", Lead Free="Lead Free", Length=0.063inch, Mount="Surface Mount", Packaging="Tape and Reel", RoHS Compliant=Yes, Termination=SMD/SMT, Thickness=0.035inch, Voltage Rating (DC)=10V, Weight=7.1E-05oz, Width=0.031inch
C2 C4 C8 C9 C10 C11 C12 C13 C14 C15 C16 C17 C19 C20 C21 C22 C23 C25 C26 C27 C30 C31 C33 C34 C35 C36 C38 C39 C43 C45 C50: library part CMP-03422-001373-1, "0.22µF 50V Ceramic Capacitor X7R 0603 (1608 Metric) 0.063\" L x 0.031\" W (1.60mm x 0.80mm)", Capacitance="220 nF", Manufacturer=YAGEO, Manufacturer Part Number=CC0603KRX7R9BB224, Package=CC0603-DA, Temperature="-55°C to +125°C", Temperature Characteristic=X7R, Temperature Coefficient=15%, Temperature Range High=+125°C, Temperature Range Low=-55°C, Tolerance=0.1, Voltage="50 V", Automotive=No, Category=Cap, ComponentLink2Description=Datasheet, ComponentLink2URL=http://www.yageo.com/documents/recent/UPY-GPHC_X7R_6.3V-to-50V_18.pdf, Device Class L1="Passive Components", Device Class L2=Capacitors, Device Class L3="Ceramic Capacitors", Digikey Description="0.22µF 50V Ceramic Capacitor X7R 0603 (1608 Metric) 0.063\" L x 0.031\" W (1.60mm x 0.80mm)", Footprint Url=http://www.yageo.com/exep/pages/download/literatures/UPY-C_GEN_24.pdf, Height=0.9mm, Lead Free=Yes, Material=Ceramic, Mouser Description="0603 50 V 0.22 uF ±10% Tolerance X7R Multilayer Ceramic Capacitor", Octopart=https://octopart.com/cc0603krx7r9bb224-yageo-30314039, RoHS=TRUE, Voltage Rating="50 V"
C3 C129 C144: library part CMP-2006-02375-5, "Chip Capacitor, 100 nF, +/- 10%, 50 V, -55 to 125 degC, 0603 (1608 Metric), RoHS, Tape and Reel", Manufacturer=Murata, Max Operating Temperature="125 degC", Min Operating Temperature="-55 degC", Package Quantity=4000, Voltage Rating="50 V", ComponentLink1Description="Manufacturer URL", ComponentLink1URL=http://www.murata.com/, ComponentLink2Description=Datasheet, ComponentLink2URL=http://psearch.en.murata.com/capacitor/product/GCM188R71H104KA57%23.pdf, DatasheetVersion=07/2016, Height="0.8 mm", Length="1.6 mm", Mount="Surface Mount", Mounting Technology="Surface Mount", PackageDescription="2-Pin Surface Mount Device, Body 1.6 x 0.8 mm", PackageReference=0603, Packaging="Tape and Reel", REACH SVHC="No SVHC", RoHSCompliant=true
C18 C24 C32: library part CMP-2000-06075-2, "CAP CER 22UF 6.3V X5R 0603", Case Code (Imperial)=0603, Case Code (Metric)=1608, Dielectric=X5R, Max Operating Temperature=85°C, Min Operating Temperature=-55°C, Package Quantity=4000, Resistor Type=Ceramic, Tolerance=20%, Voltage Rating=6.3V, Capacitance=22uF, Case/Package=0603, Depth=0.8mm, Halogen Free="Halogen Free", Lead Free="Lead Free", Length=0.063inch, Mount="Surface Mount", Packaging="Tape and Reel", RoHS Compliant=Yes, Termination=SMD/SMT, Thickness=0.035inch, Voltage Rating (DC)=6.3V, Weight=7.1E-05oz, Width=0.031inch
C37 C56 C58 C82 C149: library part CMP-2000-06074-2, "CAP CER 4.7UF 10V X5R 0603", Capacitance="4.7 uF", Manufacturer=YAGEO, Manufacturer Part Number=CC0603KRX5R6BB475, Package=CC0603-DA, Temperature="-55°C to +125°C", Temperature Characteristic=X5R, Temperature Coefficient=15%, Temperature Range High=+125°C, Temperature Range Low=-55°C, Tolerance=0.1, Voltage="10 V", Automotive=No, Category=Cap, ComponentLink2Description=Datasheet, ComponentLink2URL=http://www.yageo.com/documents/recent/UPY-GPHC_X7R_6.3V-to-50V_18.pdf, Device Class L1="Passive Components", Device Class L2=Capacitors, Device Class L3="Ceramic Capacitors", Digikey Description="CAP CER 4.7UF 10V X5R 0603", Footprint Url=http://www.yageo.com/exep/pages/download/literatures/UPY-C_GEN_24.pdf, Height=0.9mm, Lead Free=Yes, Material=Ceramic, Mouser Description="4.7µF Surface Mount, MLCC 0603 (1608 Metric) Package Ceramic Capacitors", Octopart=https://octopart.com/cc0603krx5r6bb475-yageo-9292507, RoHS=TRUE, Voltage Rating="10 V"
C40 C53 C54 C55 C57 C59 C63 C64 C65 C66 C67 C68 C69 C73 C74 C75 C76 C77 C78 C79 C81 C83 C87 C90 C92 C93 C94 C95 C97 C98 C99 C100 C102 C106 C108 C111 C113 C115 C116 C117 C126 C145 C147 C148 C150 C151 C154 C155 C159 C160 C164 C167 C168 C169 C170 C356: library part CMP-2100-03601-2, "CAP CER 0.1UF 50V X7R 0603", Manufacturer=YAGEO, Manufacturer Part Number=CC0603KRX7R9BB104, Package=CC0603-DA, Temperature="-55°C to +125°C", Temperature Characteristic=X7R, Temperature Coefficient=15%, Temperature Range High=+125°C, Temperature Range Low=-55°C, Tolerance=0.1, Voltage="50 V", Automotive=No, Capacitance="100 nF", Category=Cap, ComponentLink2Description=Datasheet, ComponentLink2URL=http://www.yageo.com/documents/recent/UPY-GPHC_X7R_6.3V-to-50V_18.pdf, Device Class L1="Passive Components", Device Class L2=Capacitors, Device Class L3="Ceramic Capacitors", Digikey Description="CAP CER 0.1UF 50V X7R 0603", Footprint Url=http://www.yageo.com/exep/pages/download/literatures/UPY-C_GEN_24.pdf, Height=0.9mm, Lead Free=Yes, Material=Ceramic, Mouser Description="Multilayer Ceramic Capacitor, CC Series, 0.1 - F, - 10%, X7R, 50 V, 0603 [1608 Metric]", Octopart=https://octopart.com/cc0603krx7r9bb104-yageo-42244635, RoHS=TRUE, Voltage Rating="50 V"
C44 C91: library part CMP-2100-03594-1, "Chip Capacitor, 100 pF, +/- 5%, 50 V, -55 to 125 degC, 0603 (1608 Metric), RoHS, Tape and Reel", Capacitance=100pF, Case Code (Imperial)=0603, Case Code (Metric)=1608, Dielectric=C0G, Insulation Resistance=100GR, Manufacturer=Yageo, Max Operating Temperature=125degC, Min Operating Temperature=-55degC, Package Description="2-Pin Surface Mount Device, Body 1.6 x 0.8 mm", Package Quantity=1, Temperature Coefficient=30ppm/degC, Tolerance=5%, Voltage=50V, Case/Package=0603, Composition=Ceramic, Datasheet URL=http://www.yageo.com/documents/recent/UPY-GP_NP0_16V-to-50V_14.pdf, Datasheet Version="Rev. 14, 07/2016", Depth=0.8mm, Height=0.8mm, Lead Free=LeadFree, Length=1.6mm, Manufacturer URL=http://www.yageo.com/, Mount=SurfaceMount, Number of Pins=2, Package Reference=0603, Packaging=TapeandReel, Radiation Hardening=No, REACH SVHC=Unknown, RoHSCompliant=True, Termination=SMD/SMT, Thickness=0.035inch, Voltage Rating=50V, Voltage Rating (DC)=50V, Width=0.8mm
C46 C47 C48 C49: library part CMP-1035-00158-3, "CAP CER 2.2PF 50V NP0 0603", Manufacturer=KEMET, Manufacturer Part Number=C0603C229C5GACTU, Package=C0603C-CF, Temperature="-55°C to +125°C", Temperature Characteristic=C0G, Temperature Coefficient=30ppm/°C, Temperature Range High=+125°C, Temperature Range Low=-55°C, Tolerance="0.25 pF", Voltage Rating="50 V", Automotive=Yes, Automotive Grade="Grade 1", Capacitance="2.2 pF", Category=Cap, ComponentLink2Description=Datasheet, ComponentLink2URL=https://api.kemet.com/component-edge/download/datasheet/C0603C100J5GACAUTO.pdf, Device Class L1="Passive Components", Device Class L2=Capacitors, Device Class L3="Ceramic Capacitors", Digikey Description="CAP CER 2.2PF 50V NP0 0603", Height=0.87mm, Lead Free=Yes, Material=Ceramic, Mouser Description="Multilayer Ceramic Capacitors MLCC - SMD/SMT 50volts 2.2pF C0G 0.25%", Octopart=https://octopart.com/c0603c229c5gactu-kemet-3874912, RoHS=TRUE
C51 C52: library part CMP-1659-00030-1, "Chip Capacitor, 18 pF, +/- 5%, 50 V, -55 to 125 degC, 0603 (1608 Metric), RoHS, Tape and Reel", Case Code (Imperial)=0603, Case Code (Metric)=1608, Max Operating Temperature="155 degC", Min Operating Temperature="-55 degC", Package Quantity=200, Power Rating="100 mW", Resistance="68.1 Ohm", Tolerance=1%, Voltage Rating="50 V", Case\Package=0603, ComponentLink1Description="Manufacturer URL", ComponentLink1URL=http://www.yageo.com/, ComponentLink2Description=Datasheet, ComponentLink2URL=http://www.yageo.com/NewPortal/yageodocoutput?fileName=/pdf/MLCC/UPY-GP_NP0_16V-to-50V_14.pdf, DatasheetVersion="Rev. 14, 07/2016", Height="0.45 mm", Length="1.6 mm", PackageDescription="2-Pin Surface Mount Device, Body 1.6 x 0.8 mm", PackageReference=0603, Packaging="Tape and Reel", Radiation Hardening=No, RoHSCompliant=true, Width="0.8 mm"
C60: library part CMP-2000-06073-2, "CAP CER 2.2UF 10V X5R 0603", Manufacturer=YAGEO, Manufacturer Part Number=CC0603KRX5R6BB225, Package=CC0603-DA, Temperature="-55°C to +125°C", Temperature Characteristic=X5R, Temperature Coefficient=15%, Temperature Range High=+125°C, Temperature Range Low=-55°C, Tolerance=0.1, Voltage="10 V", Automotive=No, Capacitance="2.2 uF", Category=Cap, ComponentLink2Description=Datasheet, ComponentLink2URL=http://www.yageo.com/documents/recent/UPY-GPHC_X7R_6.3V-to-50V_18.pdf, Device Class L1="Passive Components", Device Class L2=Capacitors, Device Class L3="Ceramic Capacitors", Digikey Description="CAP CER 2.2UF 10V X5R 0603", Footprint Url=http://www.yageo.com/exep/pages/download/literatures/UPY-C_GEN_24.pdf, Height=0.9mm, Lead Free=Yes, Material=Ceramic, Mouser Description="Multilayer Ceramic Capacitors MLCC - SMD/SMT 2.2uF 10V X5R 10%", Octopart=https://octopart.com/cc0603krx5r6bb225-yageo-8376528, RoHS=TRUE, Voltage Rating="10 V"
C61 C62 C70 C71 C72 C80: library part CMP-2000-06075-2, "CAP CER 22UF 6.3V X5R 0603", Capacitance=22uF, Case Code (Imperial)=0603, Case Code (Metric)=1608, Dielectric=X5R, Max Operating Temperature=85°C, Min Operating Temperature=-55°C, Package Quantity=4000, Resistor Type=Ceramic, Tolerance=20%, Voltage Rating=6.3V, Case/Package=0603, Depth=0.8mm, Halogen Free="Halogen Free", Lead Free="Lead Free", Length=0.063inch, Mount="Surface Mount", Packaging="Tape and Reel", RoHS Compliant=Yes, Termination=SMD/SMT, Thickness=0.035inch, Voltage Rating (DC)=6.3V, Weight=7.1E-05oz, Width=0.031inch
C88: library part CMP-03020-034683-2, "CAP CER 4700PF 2KV X7R 1210", Capacitance=4.7nF, Case Code (Imperial)=1210, Case Code (Metric)=3225, Dielectric=X7R, Dielectric Material=Ceramic, Max Operating Temperature=125°C, Min Operating Temperature=-55°C, Tolerance=10%, Voltage Rating=2kV, Case/Package=1210, Depth=2.5mm, Dissipation Factor=2.5%, Height=2.1mm, Length=3.2mm, Material=Ceramic, Mount="Surface Mount", NexarPartId=17605740, Packaging="Tape and Reel", REACH SVHC="No SVHC", RoHS=Compliant, Schedule B="8532240020, 8532240020", Termination=SMD/SMT, Thickness=2.3114mm, Voltage Rating (DC)=2kV, Width=2.5mm
C101 C103: library part CMP-03422-000162-1, "1UF 10V X5R 0603", Capacitance="1 uF", Manufacturer=YAGEO, Manufacturer Part Number=CC0603KRX5R6BB105, Package=CC0603-DA, Temperature="-55°C to +125°C", Temperature Characteristic=X5R, Temperature Coefficient=15%, Temperature Range High=+125°C, Temperature Range Low=-55°C, Tolerance=0.1, Voltage="10 V", Automotive=No, Category=Cap, ComponentLink2Description=Datasheet, ComponentLink2URL=http://www.yageo.com/documents/recent/UPY-GPHC_X7R_6.3V-to-50V_18.pdf, Device Class L1="Passive Components", Device Class L2=Capacitors, Device Class L3="Ceramic Capacitors", Digikey Description="CAP CER 1UF 10V X5R 0603", Footprint Url=http://www.yageo.com/exep/pages/download/literatures/UPY-C_GEN_24.pdf, Height=0.9mm, Lead Free=Yes, Material=Ceramic, Mouser Description="Multilayer Ceramic Capacitors MLCC - SMD/SMT 1.0uF 10V X5R 10%", Octopart=https://octopart.com/cc0603krx5r6bb105-yageo-8376527, RoHS=TRUE, Voltage Rating="10 V"
C104 C107 C109 C112 C135 C136 C140: library part CC0603JRNPO9BN470, "47 pF Â±5% 50V Ceramic Capacitor C0G, NP0 0603 (1608 Metric)", Package="0603 Yageo", Check_prices=https://www.snapeda.com/parts/CC0603JRNPO9BN470/Yageo/view-part/?ref=eda, MF=Yageo, MP=CC0603JRNPO9BN470, SnapEDA_Link=https://www.snapeda.com/parts/CC0603JRNPO9BN470/Yageo/view-part/?ref=snap
C105 C110: library part CMP-2100-03603-2, "CAP CER 4700PF 50V X7R 0603", Manufacturer=YAGEO, Manufacturer Part Number=CC0603KRX7R9BB472, Package=CC0603-DA, Temperature="-55°C to +125°C", Temperature Characteristic=X7R, Temperature Coefficient=15%, Temperature Range High=+125°C, Temperature Range Low=-55°C, Tolerance=0.1, Voltage="50 V", Automotive=No, Capacitance="4.7 nF", Category=Cap, ComponentLink2Description=Datasheet, ComponentLink2URL=http://www.yageo.com/documents/recent/UPY-GPHC_X7R_6.3V-to-50V_18.pdf, Device Class L1="Passive Components", Device Class L2=Capacitors, Device Class L3="Ceramic Capacitors", Digikey Description="CAP CER 4700PF 50V X7R 0603", Footprint Url=http://www.yageo.com/exep/pages/download/literatures/UPY-C_GEN_24.pdf, Height=0.9mm, Lead Free=Yes, Material=Ceramic, Mouser Description="Multilayer Ceramic Capacitors MLCC - SMD/SMT 4700PF 50V 10% 0603", Octopart=https://octopart.com/cc0603krx7r9bb472-yageo-192936, RoHS=TRUE, Voltage Rating="50 V"
C114 C122 C123 C124 C132 C133 C152 C153: library part CMP-06035-036920-1, "Chip Multilayer Ceramic Capacitors for General Purpose, 0603, 10uF, X7R, 15%, 20%, 10V", Case/Package=0603
C120 C121 C146: library part CMP-2100-03600-2, "CAP CER 10000PF 50V X7R 0603", Manufacturer=YAGEO, Manufacturer Part Number=CC0603KRX7R9BB103, Package=CC0603-DA, Temperature="-55°C to +125°C", Temperature Characteristic=X7R, Temperature Coefficient=15%, Temperature Range High=+125°C, Temperature Range Low=-55°C, Tolerance=0.1, Voltage="50 V", Automotive=No, Capacitance="10 nF", Category=Cap, ComponentLink2Description=Datasheet, ComponentLink2URL=http://www.yageo.com/documents/recent/UPY-GPHC_X7R_6.3V-to-50V_18.pdf, Device Class L1="Passive Components", Device Class L2=Capacitors, Device Class L3="Ceramic Capacitors", Digikey Description="CAP CER 10000PF 50V X7R 0603", Footprint Url=http://www.yageo.com/exep/pages/download/literatures/UPY-C_GEN_24.pdf, Height=0.9mm, Lead Free=Yes, Material=Ceramic, Mouser Description="Multilayer Ceramic Capacitor, CC Series, 0.01 - F, - 10%, X7R, 50 V, 0603 [1608 Metric]", Octopart=https://octopart.com/cc0603krx7r9bb103-yageo-192938, RoHS=TRUE, Voltage Rating="50 V"
C125 C137: library part CMP-2006-02605-1, Manufacturer=Murata, Part Number=GRM1885C1H121JA01D
C127 C138: library part CMP-14477-004372-2, "Multilayer Ceramic Capacitor 4.7uF 6.3V X7R 20% SMD 0603 T/R", Capacitance=4.7uF, Case Code (Imperial)=0603, Case Code (Metric)=1608, Max Operating Temperature=125°C, Min Operating Temperature=-55°C, Tolerance=20%, Voltage Rating=6.3V, Case/Package=0603, Mount="Surface Mount", Packaging="Cut Tape", RoHS Compliant=Yes
C128: library part C1206C226K8RACTU, "22 ÂµF Â±10% 10V Ceramic Capacitor X7R 1206 (3216 Metric)", Package="1206-2 KEMET", Check_prices=https://www.snapeda.com/parts/C1206C226K8RACTU/KEMET/view-part/?ref=eda, MF=KEMET, MP=C1206C226K8RACTU, SnapEDA_Link=https://www.snapeda.com/parts/C1206C226K8RACTU/KEMET/view-part/?ref=snap
C130 C131: library part CMP-2000-05444-2, "Chip Multilayer Ceramic Capacitors for General Purpose, 0603, 47uF, X5R, 15%, 20%, 6.3V", Case Code (Imperial)=0603, Case Code (Metric)=1608, Dielectric=X5R, Max Operating Temperature=85°C, Min Operating Temperature=-55°C, Tolerance=20%, Voltage Rating=6.3V, Capacitance=47uF, Case/Package=0603, Length=0.063inch, Mount="Surface Mount", Packaging="Tape and Reel", Thickness=0.039inch, Voltage Rating (DC)=6.3V, Width=0.031inch
C134 C139: library part CMP-2100-03600-2, "CAP CER 10000PF 50V X7R 0603", Capacitance="10 nF", Manufacturer=YAGEO, Manufacturer Part Number=CC0603KRX7R9BB103, Package=CC0603-DA, Temperature="-55°C to +125°C", Temperature Characteristic=X7R, Temperature Coefficient=15%, Temperature Range High=+125°C, Temperature Range Low=-55°C, Tolerance=0.1, Voltage="50 V", Automotive=No, Category=Cap, ComponentLink2Description=Datasheet, ComponentLink2URL=http://www.yageo.com/documents/recent/UPY-GPHC_X7R_6.3V-to-50V_18.pdf, Device Class L1="Passive Components", Device Class L2=Capacitors, Device Class L3="Ceramic Capacitors", Digikey Description="CAP CER 10000PF 50V X7R 0603", Footprint Url=http://www.yageo.com/exep/pages/download/literatures/UPY-C_GEN_24.pdf, Height=0.9mm, Lead Free=Yes, Material=Ceramic, Mouser Description="Multilayer Ceramic Capacitor, CC Series, 0.01 - F, - 10%, X7R, 50 V, 0603 [1608 Metric]", Octopart=https://octopart.com/cc0603krx7r9bb103-yageo-192938, RoHS=TRUE, Voltage Rating="50 V"
C141: library part CMP-2006-02891-1, Manufacturer=Murata, Part Number=GRM188R71H102KA01D
C142 C245: library part CMP-03422-000162-1, "CAP CER 1UF 10V X5R 0603", Manufacturer=YAGEO, Manufacturer Part Number=CC0603KRX5R6BB105, Package=CC0603-DA, Temperature="-55°C to +125°C", Temperature Characteristic=X5R, Temperature Coefficient=15%, Temperature Range High=+125°C, Temperature Range Low=-55°C, Tolerance=0.1, Voltage="10 V", Automotive=No, Capacitance="1 uF", Category=Cap, ComponentLink2Description=Datasheet, ComponentLink2URL=http://www.yageo.com/documents/recent/UPY-GPHC_X7R_6.3V-to-50V_18.pdf, Device Class L1="Passive Components", Device Class L2=Capacitors, Device Class L3="Ceramic Capacitors", Digikey Description="CAP CER 1UF 10V X5R 0603", Footprint Url=http://www.yageo.com/exep/pages/download/literatures/UPY-C_GEN_24.pdf, Height=0.9mm, Lead Free=Yes, Material=Ceramic, Mouser Description="Multilayer Ceramic Capacitors MLCC - SMD/SMT 1.0uF 10V X5R 10%", Octopart=https://octopart.com/cc0603krx5r6bb105-yageo-8376527, RoHS=TRUE, Voltage Rating="10 V"
C161: library part CMP-03422-000162-1, "CAP CER 1UF 10V X5R 0603", Capacitance="1 uF", Manufacturer=YAGEO, Manufacturer Part Number=CC0603KRX5R6BB105, Package=CC0603-DA, Temperature="-55°C to +125°C", Temperature Characteristic=X5R, Temperature Coefficient=15%, Temperature Range High=+125°C, Temperature Range Low=-55°C, Tolerance=0.1, Voltage="10 V", Automotive=No, Category=Cap, ComponentLink2Description=Datasheet, ComponentLink2URL=http://www.yageo.com/documents/recent/UPY-GPHC_X7R_6.3V-to-50V_18.pdf, Device Class L1="Passive Components", Device Class L2=Capacitors, Device Class L3="Ceramic Capacitors", Digikey Description="CAP CER 1UF 10V X5R 0603", Footprint Url=http://www.yageo.com/exep/pages/download/literatures/UPY-C_GEN_24.pdf, Height=0.9mm, Lead Free=Yes, Material=Ceramic, Mouser Description="Multilayer Ceramic Capacitors MLCC - SMD/SMT 1.0uF 10V X5R 10%", Octopart=https://octopart.com/cc0603krx5r6bb105-yageo-8376527, RoHS=TRUE, Voltage Rating="10 V"
C162: library part GRM1555C1H2R4WA01D, "SMD Capacitor C0G(EIA) with Capacitance: 2.4pF Tol. 0.05pF. Rated Voltage: 50Vdc", Package="1005-2 Murata", Check_prices=https://www.snapeda.com/parts/GRM1555C1H2R4WA01D/Murata/view-part/?ref=eda, MF=Murata, MP=GRM1555C1H2R4WA01D, SnapEDA_Link=https://www.snapeda.com/parts/GRM1555C1H2R4WA01D/Murata/view-part/?ref=snap
C163: library part CMP-1034-00237-2, Manufacturer=Murata, Part Number=GRM1555C1H3R0WA01D
C165 C166: library part CMP-1659-00026-1, "Chip Capacitor, 22 pF, +/- 5%, 50 V, -55 to 125 degC, 0603 (1608 Metric), RoHS, Tape and Reel", ComponentLink1Description="Manufacturer URL", ComponentLink1URL=http://www.yageo.com/, ComponentLink2Description=Datasheet, ComponentLink2URL=http://www.yageo.com/documents/recent/UPY-GP_NP0_16V-to-50V_8.pdf, DatasheetVersion="Rev. 8, 08/2011", PackageDescription="2-Pin Surface Mount Device, Body 1.6 x 0.8 mm", PackageReference=0603
CAN_1 CAN_2 I2C_1 I2C_2 RS-485 UART: library part 282834-4, "Conn; Term Blk; PCB; Wire Receptacle; 4; 2.54mm; 30-16AWG; Green; 10A;150V; M1.6", Package=None, Centerline_Pitch="2.54 mm[.1 in]", Check_prices=https://www.snapeda.com/parts/282834-4/TE+Connectivity+AMP+Connectors/view-part/?ref=eda, EU_RoHS_Compliance="Compliant with Exemptions", MF="TE Connectivity", MP=282834-4, Number_of_Positions=4, SnapEDA_Link=https://www.snapeda.com/parts/282834-4/TE+Connectivity+AMP+Connectors/view-part/?ref=snap
CSI_FPC: library part CMP-1241-00556-1, "0.5 mm Pitch Easy-On(TM) Type FPC Connector, 1.2 mm Mated Height, Right Angle, ZIF, SMT, Bottom Contact, 24 Circuits, -20 to 85 degC, ELV and RoHS Compliant, Tape and Reel", Current (Max per Contact)=0.5A, Manufacturer=Molex, Voltage (Max)=50V, Circuits (Loaded)=24, ComponentLink1Description="Manufacturer URL", ComponentLink1URL=http://www.molex.com/molex/index.jsp, ComponentLink2Description=Datasheet, ComponentLink2URL=http://www.molex.com/webdocs/datasheets/pdf/en-us/0545482471_FFC_FPC_CONNECTORS.pdf, ComponentLink3Description="Package Specification", ComponentLink3URL=http://www.molex.com/pdm_docs/sd/545482471_sd.pdf, Contact Position=Bottom, Durability (mating cycles max)=20, Entry Angle="90degrees Angle", Mated Height=1.20mm, Material - Metal="Phosphor Bronze", Material - Plating Mating=Gold, Material - Plating Termination=Tin, Mounting Technology="Surface Mount", Number of Rows=1, Orientation="Right Angle", PackageDescription="24-Lead FPC Connector, Pitch 0.5 mm", PackageReference=54548-2471, PackageVersion="Rev. N, 06/2008", Packing="Tape and Reel", PartNumber=54548-2471, PCB Locator=No, PCB Retention=Yes, Pitch - Mating Interface=0.50mm, Polarized to PCB=Yes, RoHS=TRUE, Stackable=No
D1: library part CMP-04989-000015-1, "TVS DIODE 3.6V 8.8V 10USON", Clamping Voltage=8.8V, Max Operating Temperature=125°C, Min Breakdown Voltage=5.5V, Min Operating Temperature=-40°C, Operating Supply Voltage=3.6V, Peak Pulse Current=5A, Peak Pulse Power=17W, Power Line Protection=No, Resistor Type=Zener, Interface=USB, Lead Free="Lead Free", Mount="Surface Mount", Number of Bidirectional Channels=4, Number of Channels=4, Number of Pins=10, Packaging="Cut Tape", REACH SVHC="No SVHC", Reverse Standoff Voltage=3.6V, RoHS Compliant=Yes
D2: library part CMP-07401-000032-1, "TVS DIODE 28VWM 45.4VC SMB", Breakdown Voltage=35.8V, Case/Package=DO-214AA, Clamping Voltage=45.4V, Leakage Current=5uA, Max Operating Temperature=150°C, Max Power Dissipation=600W, Max Surge Current=100A, Min Breakdown Voltage=31.1V, Min Operating Temperature=-55°C, Operating Supply Voltage=3.5V, Package Quantity=1, Peak Pulse Current=13.2A, Power Line Protection=No, Resistor Type=Zener, Reverse Standoff Voltage=28V, Test Current=1mA, Diode Type=ZENER, Direction=Bidirectional, Element Configuration=Single, ESD Protection=Yes, Height=2.42mm, Length=4.57mm, Max Breakdown Voltage=35.8V, Max Reverse Leakage Current=5uA, Mount="Surface Mount", Number of Bidirectional Channels=1, Number of Channels=1, Number of Elements=1, Number of Pins=2, Packaging="Tape and Reel", Peak Pulse Power=600W, Polarity=Bidirectional, Radiation Hardening=No, REACH SVHC="No SVHC", Reverse Breakdown Voltage=31.1V, RoHS Compliant=Yes, Series=SMBJ, Termination=SMD/SMT, Width=3.94mm
D3 D4: library part CMP-14432-000001-1, "TVS DIODE 5V 14V SOD323"
D5 D6 D7: "50V Clamp 3A (8/20Âµs) Ipp Tvs Diode Surface Mount SOT-323", Package="SOT-23-3 NXP Semiconductors", Check_prices=https://www.snapeda.com/parts/PESD1CAN/Nexperia/view-part/?ref=eda, MF="Nexperia USA", MP=PESD1CAN, SnapEDA_Link=https://www.snapeda.com/parts/PESD1CAN/Nexperia/view-part/?ref=snap
D8 D9 D10 D11 D12 D13 D14 D15 D16 D17 D22 D23 D24 D25: library part CMP-03913-71101643-2, "TVS diode [Würth Elektronik] 824521751 TVS diode", Breakdown Voltage=87.7V, Clamping Voltage=121V, Leakage Current=1µA, Max Operating Temperature=150°C, Min Operating Temperature=-65°C, Peak Pulse Current=5A, Peak Pulse Power=600W, Power Line Protection=No, Reverse Standoff Voltage=75V, Composition=Zener, Height=2.4mm, Length=4.32mm, Max Breakdown Voltage=87.7V, Min Breakdown Voltage=87.7V, Mount="Surface Mount", Number of Bidirectional Channels=1, Number of Pins=2, Packaging="Cut Tape", Polarity=Bidirectional, REACH SVHC=Unknown, RoHS=Compliant, Width=3.62mm
D18: library part CMP-02539-000066-1, "DIODE SCHOTTKY 40V 3A DO214AB", Average Rectified Current=3A, Case/Package=SMC, Forward Voltage=500mV, Max Operating Temperature=125°C, Max Repetitive Reverse Voltage (Vrrm)=40V, Max Reverse Current=500uA, Max Surge Current=100A, Min Operating Temperature=-55°C, Package Quantity=3500, Element Configuration=Single, Forward Current=3A, Max Reverse Leakage Current=500uA, Max Reverse Voltage (DC)=40V, Mount="Surface Mount", Number of Pins=2, Packaging="Tape and Reel", Peak Non-Repetitive Surge Current=100A, Radiation Hardening=No, RoHS Compliant=Yes, Series=-
D20: library part CMP-1667-00003-3, "DIODE SCHOTTKY 40V 3A SMA", Average Rectified Current=3A, Capacitance=250pF, Case/Package=SMA, Forward Voltage=500mV, Max Forward Surge Current (Ifsm)=80A, Max Operating Temperature=125°C, Max Repetitive Reverse Voltage (Vrrm)=40V, Max Reverse Current=500uA, Min Operating Temperature=-55°C, Package Quantity=5000, Contact Plating=Tin, Current=3A, Current Rating=3A, Element Configuration=Single, Forward Current=3A, Height=2.3mm, Lead Free="Lead Free", Length=4.6mm, Max Reverse Voltage (DC)=40V, Mount="Surface Mount", Number of Pins=2, Output Current=3A, Packaging="Tape and Reel", Peak Non-Repetitive Surge Current=80A, Polarity=Standard, Radiation Hardening=No, REACH SVHC="No SVHC", RoHS Compliant=Yes, Series=-, Termination=SMD/SMT, Voltage=40V, Voltage Rating (DC)=40V, Weight=0.002258oz, Width=2.92mm
DEVICE_1 DEVICE_2: library part CMP-2000-05404-1, "1 Port Right Angle Through Hole Mount Female Type A USB Connector, 4 Position, -55 to 85 degC, RoHS, Tube", Manufacturer="TE Connectivity", Package Description="4-Pin Through Hole Device, Body 14 x 13.13 mm, Pitch 2.5 mm", Connector Mounting=PCB, Connector Type=USBA, Contact Material=Copper, Contact Plating=Gold, Contact Termination Type=Solder, Datasheet URL=http://www.farnell.com/cad/1653030.pdf, Datasheet Version=Feb-12, Gender=Receptacle, Manufacturer URL=http://www.te.com/, No. of Contacts=4, Package Reference=292303-1, SVHC=NoSVHC(16-Jun-2014)
DRAM: library part CMP-2000-07475-2, "IC DRAM 4G PARALLEL 96FBGA", Manufacturer=Micron, Max Supply Voltage=1.45V, Min Supply Voltage=1.283V, Nominal Supply Current=12-156mA, Package=TW, Temperature="0°C to +85°C", Temperature Range High=+85°C, Temperature Range Low=0°C, Access Time=1.07ns, Automotive=No, Category=IC, ComponentLink2Description=Datasheet, ComponentLink2URL=https://www.micron.com/-/media/client/global/documents/products/data-sheet/dram/ddr3/4gb_ddr3l.pdf, Device Class L1="Integrated Circuits (ICs)", Device Class L2=Memory, Device Class L3=RAM, Digikey Description="IC DRAM 4G PARALLEL 96FBGA", Height=1.2mm, Interface=Parallel, Lead Free=Yes, Manufacturer Part Number=MT41K256M16TW-107:P, Memory Size=4Gbits, Memory Type=SDRAM,DDR3, Octopart=https://octopart.com/mt41k256m16tw-107%3Ap-micron-66533852, RoHS=TRUE, Standoff Height=0.29mm
EMMC: "4GB e.MMC Flash v5.1 Vcc 2.7 V - 3.6 V (13 x 11.5 x 0.8mm) I-Temp - FBGA-153", Package=None, Check_prices=https://www.snapeda.com/parts/S40FC004C1B1I00000/SkyHigh+Memory/view-part/?ref=eda, MF="SkyHigh Memory", MP=S40FC004C1B1I00000, SnapEDA_Link=https://www.snapeda.com/parts/S40FC004C1B1I00000/SkyHigh+Memory/view-part/?ref=snap
ETHENET: "RJ45 CONN, JACK, 8P8C, 1PORT, SMT ROHS COMPLIANT: YES", Package=None, Check_prices=https://www.snapeda.com/parts/7498010210A/W%25C3%25BCrth+Elektronik+Midcom/view-part/?ref=eda, MF="WÃ¼rth Elektronik", MP=7498010210A, SnapEDA_Link=https://www.snapeda.com/parts/7498010210A/W%25C3%25BCrth+Elektronik+Midcom/view-part/?ref=snap